# Altium PCB PCB_PowerBoard_7500-0430.PcbDoc (part 3 of 5)
Units mil, origin at the board's own origin, x right, y up, seen from the top; angles counter-clockwise.
Board outline 4000 x 3250 mil, 4 copper layers (Top Layer, Layer 1, Layer 2, Bottom Layer), stack 62.449 mil thick; 205 components, 100 nets, 1585 pads, 235 vias.
Unrouted connection lines stored in the file: 2.
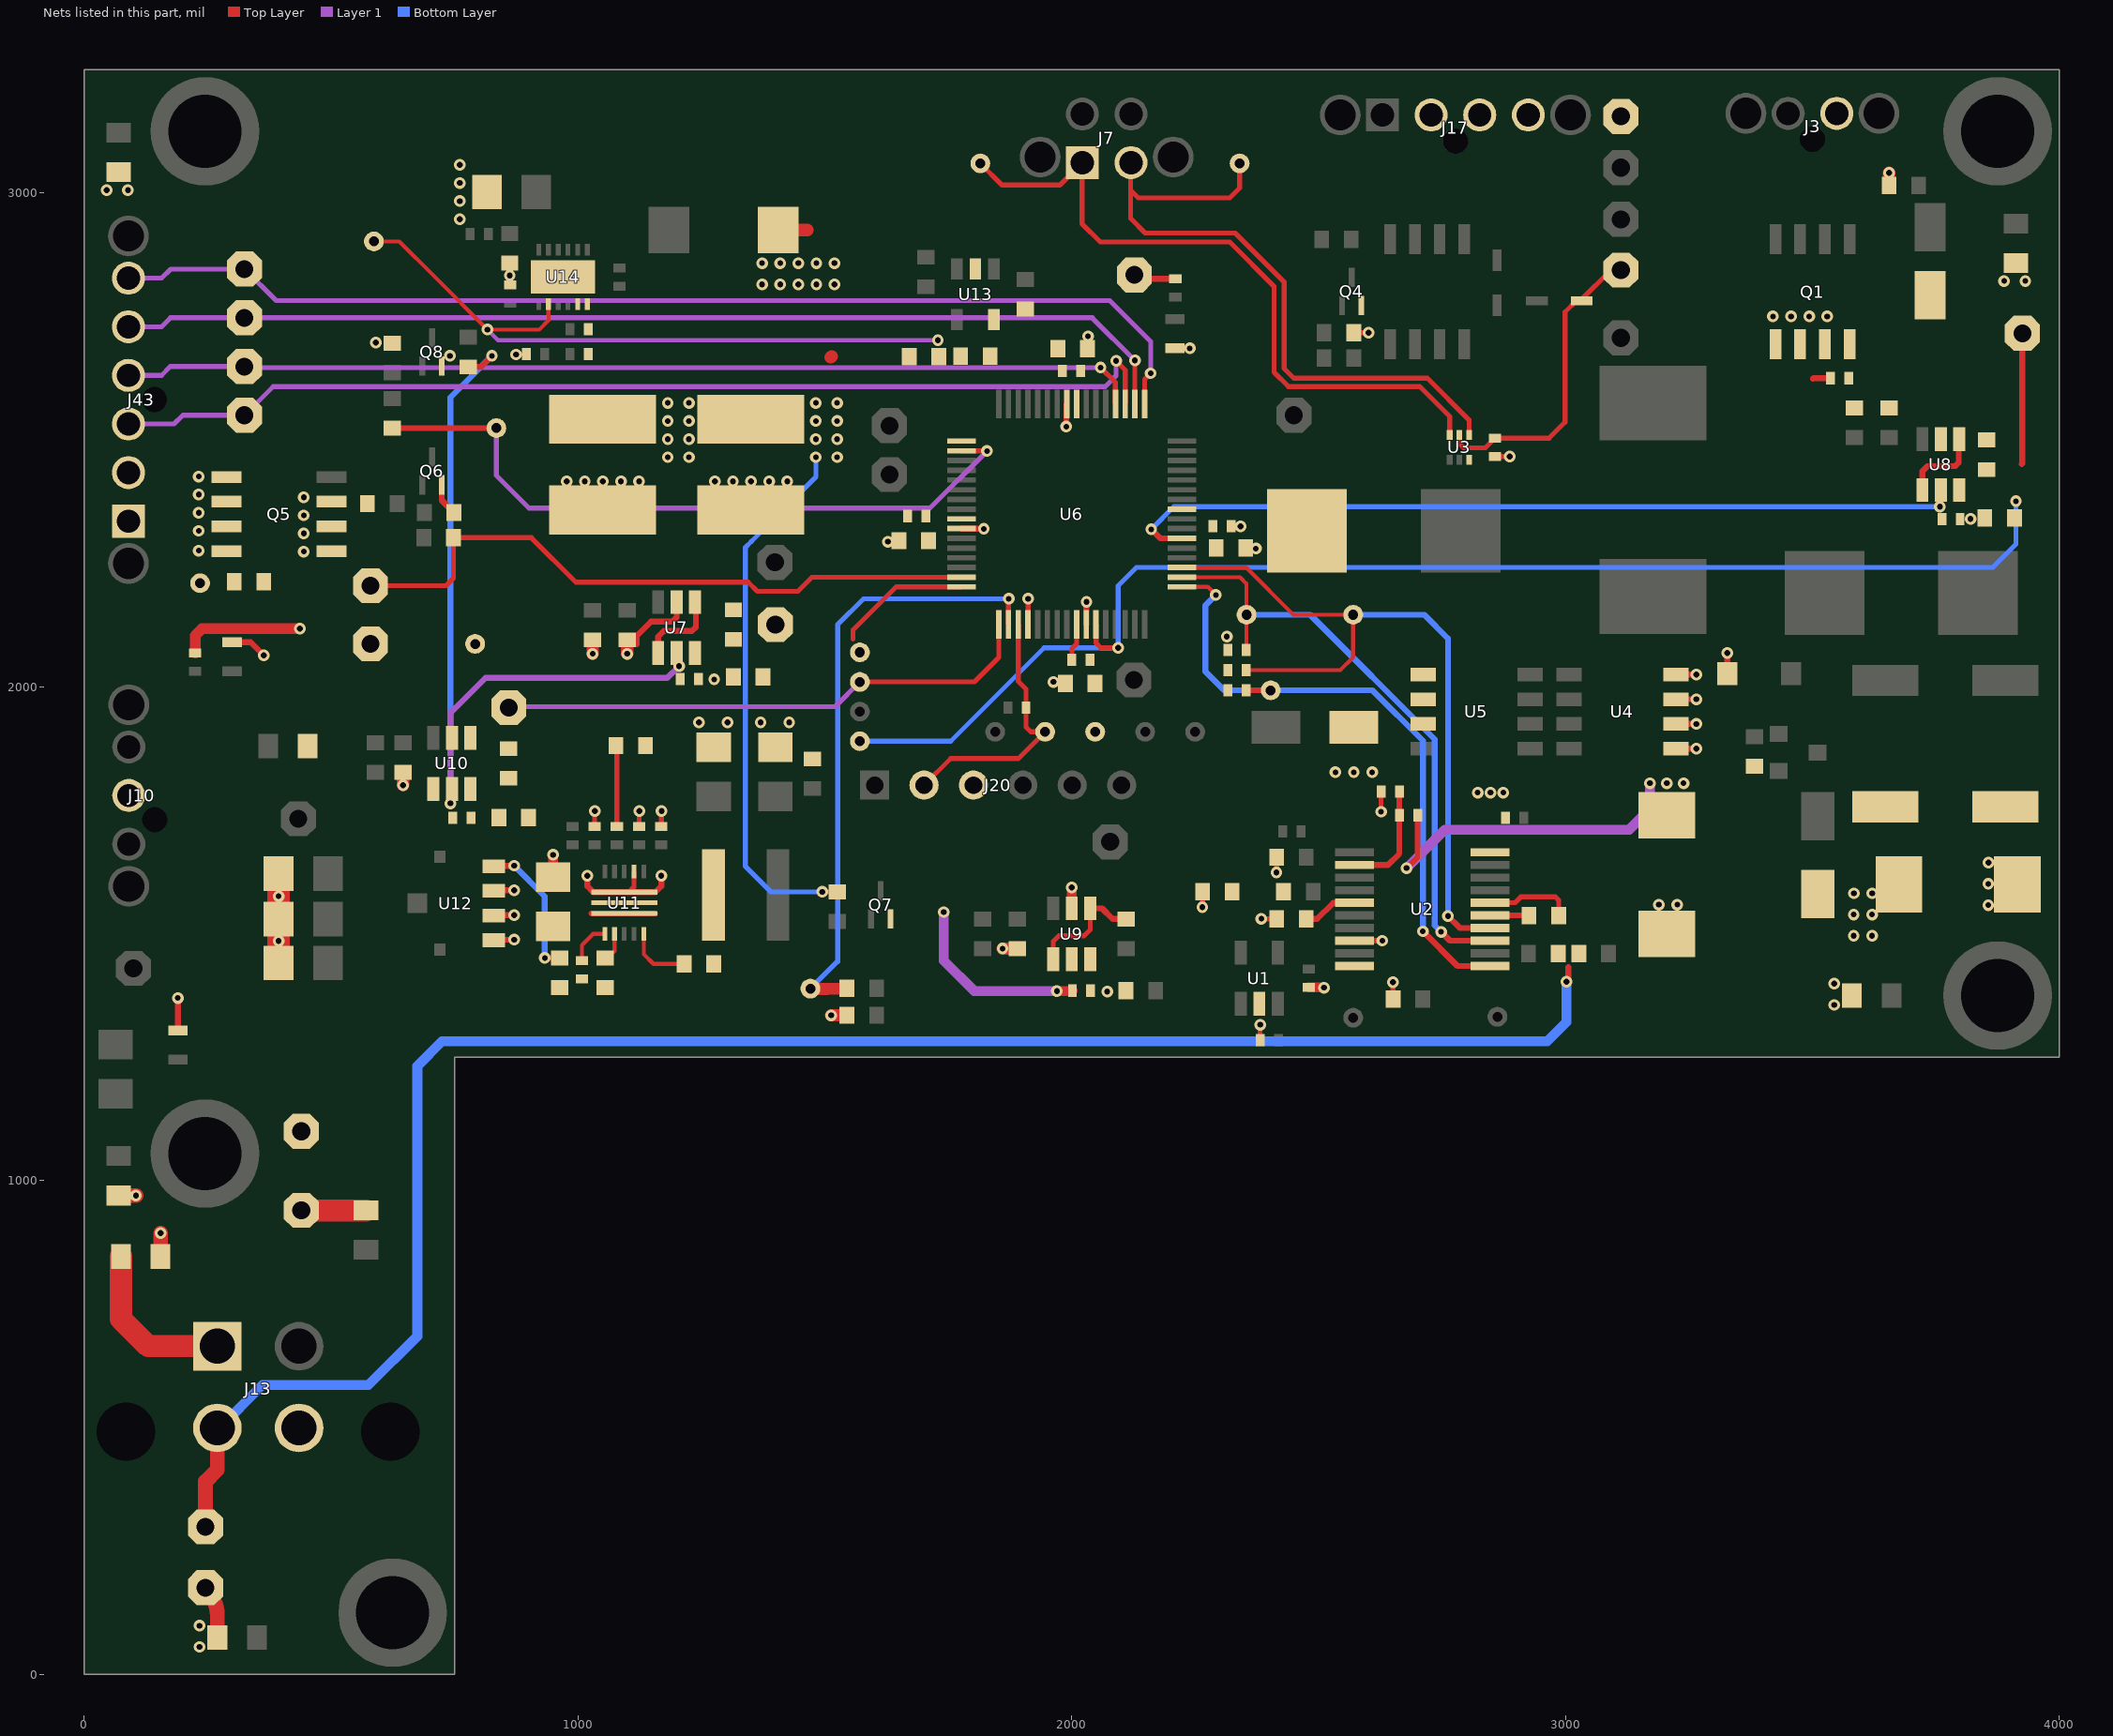
[diagram p4: the nets of this part, all layers, seen from the top]

## Part data (continued)
R10 R11 R17 R18 R19 R20 R21: library part RC0805FR-070RL, "RES 0 OHM JUMPER 1/8W 0805", Case Code (Imperial)=0805, Case Code (Metric)=2012, LCSC Part Number=C100045, Manufacturer=Yageo, Max Operating Temperature=155°C, Max Power Dissipation=125mW, Min Operating Temperature=-55°C, Resistance=0mR, Resistor Type="Thick Film", Tolerance=1%, Case/Package=0805, Category="Chip SMD Resistors", ComponentLink1Description=https://datasheet.ciiva.com/15189/getdatasheetpartid-348154-15189885.pdf?src-supplier=Verical, ComponentLink1URL=https://datasheet.ciiva.com/15189/getdatasheetpartid-348154-15189885.pdf?src-supplier=Verical, ComponentLink2Description=https://datasheet.ciiva.com/17042/rc0805-17042698.pdf?src-supplier=Future+Electronics, ComponentLink2URL=https://datasheet.ciiva.com/17042/rc0805-17042698.pdf?src-supplier=Future+Electronics, Construction=Rectangular, Contact Plating=Tin,Matte, Depth=1.25mm, Features="Moisture Resistant", Item Type=Resistor, Lead Free="Lead Free", Length=2mm, Manufacturer Part Number=RC0805FR-070RL, Military Standard=Not, Number of Terminations=2, Packaging="Tape and Reel", Power Rating=125mW, Pricing 1="5000=0.00281, 10000=0.00277, 20000=0.00269 (USD)", Radiation Hardening=No, RoHS=Yes, RoHS Compliant=Yes, Series=RC, Size Code=0805, Stock 1=85000, Supplier 1=Avnet, Supplier Part Number 1=RC0805FR-070RL
R14: library part RT0603BRD0710KL, "RES SMD 10K OHM 0.1% 1/10W 0603", Case/Package=0603, LCSC Part Number=C95204, Manufacturer=Yageo, Max Operating Temperature=155°C, Min Operating Temperature=-55°C, Package Height=0.45mm, Package Length=1.6mm, Package Style=SMTMeter, Package Width=0.8mm, Power=100mW, Rated Temperature=70°C, Resistor Type="FIXED RESISTOR", Supplier Part Number 1=1991391P, Temperature Coefficient=25ppm/°C, Tolerance=0.1%, Working Voltage=75V, Category="Chip SMD Resistors", ComponentLink1Description=https://datasheet.ciiva.com:443/pdfs/VipMasterIC/IC/YAGO/YAGO-S-A0008510989/YAGO-S-A0008510989-1.pdf?src-supplier=IHS+Markit, ComponentLink1URL=https://datasheet.ciiva.com:443/pdfs/VipMasterIC/IC/YAGO/YAGO-S-A0008510989/YAGO-S-A0008510989-1.pdf?src-supplier=IHS+Markit, ComponentLink2Description=https://datasheet.ciiva.com/5624/pyu-rt-1-to-0-05-rohs-l-4-5624351.pdf?src-supplier=Mouser, ComponentLink2URL=https://datasheet.ciiva.com/5624/pyu-rt-1-to-0-05-rohs-l-4-5624351.pdf?src-supplier=Mouser, ComponentLink3Description=https://datasheet.ciiva.com/29721/pyu-rt-1-to-0-05-rohs-l-4-29721177.pdf?src-supplier=Digi-Key, ComponentLink3URL=https://datasheet.ciiva.com/29721/pyu-rt-1-to-0-05-rohs-l-4-29721177.pdf?src-supplier=Digi-Key, Construction=Chip, Item Type=Resistor, Manufacturer Part Number=RT0603BRD0710KL, Mounting Technology="Surface Mount", Packaging="Tape and Reel", Pins=2, Pricing 1="100=0.29800, 250=0.27800, 500=0.25900, 1000=0.23700 (GBP)", Reach SVHC Compliant=Yes, RoHS=Yes, RoHS Compliant=Yes, Stock 1=20510, Supplier 1=Rs, Technology="THIN FILM", Termination=Wraparound
R15 R39 R45 R58: library part RC0603FR-071KL, "RES SMD 1K OHM 1% 1/10W 0603", Case Code (Imperial)=0603, Case Code (Metric)=1608, LCSC Part Number=C22548, Manufacturer=Yageo, Max Operating Temperature=155°C, Min Operating Temperature=-55°C, Power Rating=100mW, Resistance=1kR, Supplier Part Number 1=311-1.00KHRDKR-ND, Temperature Coefficient=100ppm/°C, Tolerance=1%, Voltage Rating=50V, Case/Package=0603, ComponentLink1Description=https://www.verical.com/server-webapp/html/getDatasheet?partID=409289&src-supplier=Verical, ComponentLink1URL=https://www.verical.com/server-webapp/html/getDatasheet?partID=409289&src-supplier=Verical, ComponentLink2Description=http://documents.rs-components.com/techlib://itc_doclist_GB.htm?stockno=5048928&src-supplier=RSComponents, ComponentLink2URL=http://documents.rs-components.com/techlib://itc_doclist_GB.htm?stockno=5048928&src-supplier=RSComponents, ComponentLink3Description=http://www.yageo.com/documents/recent/PYu-RC0603_51_RoHS_L_4.pdf?src-supplier=Avnet+Europe, ComponentLink3URL=http://www.yageo.com/documents/recent/PYu-RC0603_51_RoHS_L_4.pdf?src-supplier=Avnet+Europe, ComponentLink4Description=http://www.farnell.com/datasheets/2167052.pdf?src-supplier=Element14, ComponentLink4URL=http://www.farnell.com/datasheets/2167052.pdf?src-supplier=Element14, ComponentLink5Description=http://www.farnell.com/datasheets/1868787.pdf?src-supplier=Element14, ComponentLink5URL=http://www.farnell.com/datasheets/1868787.pdf?src-supplier=Element14, ComponentLink6Description=http://www.yageo.com/documents/recent/PYu-RC_Group_51_RoHS_L_2.pdf?src-supplier=Avnet, ComponentLink6URL=http://www.yageo.com/documents/recent/PYu-RC_Group_51_RoHS_L_2.pdf?src-supplier=Avnet, ComponentLink7Description=https://www.verical.com/server-webapp/html/getDatasheet?partID=404327&src-supplier=Verical, ComponentLink7URL=https://www.verical.com/server-webapp/html/getDatasheet?partID=404327&src-supplier=Verical, ComponentLink8Description=http://www.farnell.com/datasheets/443971.pdf?src-supplier=Element14, ComponentLink8URL=http://www.farnell.com/datasheets/443971.pdf?src-supplier=Element14, Composition="Thick Film", Contact Plating=Tin,Matte, Depth=0.8mm, Height=0.45mm, Item Type=Resistor, Lead Free="Lead Free", Length=1.6mm, Manufacturer Part Number=RC0603FR-071KL, Military Standard=Not, Packaging="Tape and Reel", Pricing 1="1=0.1, 10=0.023, 100=0.0094, 1000=0.0042, 2500=0.0037 (USD)", Radiation Hardening=No, REACH SVHC="No SVHC", Stock 1=21472395, Supplier 1=Digi-Key, Termination=SMD/SMT
R26 R31 R36 R37: library part RNCS0603BKE10K0, "Res Thin Film 0603 10K Ohm 0.1% 0.063W(1/16W) ±25ppm/C Pad SMD Automotive T/R", Case Code (Imperial)=0603, Case Code (Metric)=1608, Manufacturer="Stackpole Electronics", Max Operating Temperature=155°C, Max Power Dissipation=63mW, Min Operating Temperature=-55°C, Supplier Part Number=RNCS0603BKE10K0CT-ND, Temperature Coefficient=25ppm/°C, Tolerance=0.1%, Case/Package=0603, Category="Chip SMD Resistors", ComponentLink1Description=https://datasheet.ciiva.com/2479/sei-rncs-rnch-2479443.pdf?src-supplier=Digikey, ComponentLink1URL=https://datasheet.ciiva.com/2479/sei-rncs-rnch-2479443.pdf?src-supplier=Digikey, ComponentLink2Description=https://datasheet.ciiva.com/2479/sei-rncs-rnch-2479444.pdf?src-supplier=Digikey, ComponentLink2URL=https://datasheet.ciiva.com/2479/sei-rncs-rnch-2479444.pdf?src-supplier=Digikey, Contact Plating=Tin,Matte, Features="Moisture Resistant,Automotive AEC-Q200", Height=0.022inch, Lead Free="Lead Free", Length=0.061inch, Manufacturer Part Number=RNCS0603BKE10K0, Mounting Technology="Surface Mount", Number of Terminations=2, Packaging="Tape and Reel", Pricing="1=0.26, 10=0.191, 50=0.149, 100=0.133, 500=0.10048 (USD)", Radiation Hardening=No, RoHS=Yes, RoHS Compliant=Yes, Series=RNCS, Stock=21197, Supplier=Digikey, Width=0.031inch
R27 R33: library part CPF0603B30KE1, "Res Thin Film 0603 30K Ohm 0.1% 0.063W(1/16W) ±25ppm/C Epoxy Pad SMD Medical T/R", Manufacturer="TE Connectivity", Operating Supply Voltage=50V, Supplier Part Number=A103082CT-ND, Category="Chip SMD Resistors", ComponentLink1Description=https://datasheet.ciiva.com/22670/1723857-22670797.pdf?src-supplier=Element14, ComponentLink1URL=https://datasheet.ciiva.com/22670/1723857-22670797.pdf?src-supplier=Element14, ComponentLink2Description=https://datasheet.ciiva.com/28584/1723857-28584543.pdf?src-supplier=Element14, ComponentLink2URL=https://datasheet.ciiva.com/28584/1723857-28584543.pdf?src-supplier=Element14, ELV=5681ELVCompliant, Manufacturer Part Number=CPF0603B30KE1, Pricing="1=0.42, 10=0.299, 50=0.2326, 100=0.2077, 500=0.15724 (USD)", RoHS=Yes, Stock=3038, Supplier=Digikey, Voltage Rating (DC)=50V
R28 R29 R34 R35: library part RC0603FR-07100RL, "RES SMD 100 OHM 1% 1/10W 0603", Case Code (Imperial)=0603, Case Code (Metric)=1608, LCSC Part Number=C105588, Manufacturer=Yageo, Max Operating Temperature=155°C, Max Power Dissipation=100mW, Min Operating Temperature=-55°C, Resistance Tolerance=1%, Resistor Type="Thick Film", Temperature Coefficient=100ppm/°C, Voltage Rating=50V, Case/Package=0603, Category="Chip SMD Resistors", Construction=Rectangular, Depth=0.8mm, Features="Moisture Resistant", Height=0.45mm, Item Type=Resistor, Lead Free="Lead Free", Length=1.6mm, Manufacturer Part Number=RC0603FR-07100RL, Military Standard=Not, Number of Pins=2, Number of Terminations=2, Packaging="Tape and Reel", Power Rating=100mW, Pricing 1="5000=0.00300, 5000=0.00200, 5000=0.00450, 50000=0.00410, 500000=0.00230, 2500000=0.00140 (USD)", REACH SVHC=Unknown, Resistance=100R, RoHS=Yes, RoHS Compliant=Yes, Series=RC, Size Code=0603, Stock 1=3800000, Supplier 1="Arrow Electronics", Supplier Part Number 1=RC0603FR-07100RL, Technology="THICK FILM", Termination=SMD/SMT, Tolerance=1%, Voltage Rating (DC)=50V, Width=0.8mm
R30: library part CPF0603B15KE1, "Res Thin Film 0603 15K Ohm 0.1% 0.063W(1/16W) ±25ppm/C Pad SMD T/R", Case Code (Imperial)=0603, Case Code (Metric)=1608, Manufacturer="TE Connectivity Neohm", Max Operating Temperature=155°C, Max Power Dissipation=63mW, Min Operating Temperature=-55°C, Number of Resistors=1, Operating Supply Voltage=50V, Package Quantity=1000, Resistance Tolerance=0.1%, Resistor Type="Thin Film", Supplier Part Number=A103258CT-ND, Temperature Coefficient=25ppm/°C, Voltage Rating (DC)=120V, Case/Package=0603, Category="Chip SMD Resistors", ComponentLink1Description=https://datasheet.ciiva.com/12795/eng-ds-1773200-i-12795533.pdf?src-supplier=Mouser, ComponentLink1URL=https://datasheet.ciiva.com/12795/eng-ds-1773200-i-12795533.pdf?src-supplier=Mouser, Depth=800um, ELV=5681ELVCompliant, Height=0.45mm, Lead Free=5697LeadFree, Length=1.55mm, Manufacturer Part Number=CPF0603B15KE1, Military Standard=4991MilitaryStandard, Mounting Technology="Surface Mount", Number of Terminations=2, Packaging="Tape and Reel", Pins=2, Power Rating=63mW, Pricing="1=0.39, 10=0.285, 50=0.2196, 100=0.1951, 500=0.14598 (USD)", Radiation Hardening=5898YesNo, Reach SVHC Compliant=No, RoHS=Yes, RoHS Compliant=Yes, Series=CPF, Stock=29093, Supplier=Digikey, Termination=Solder, Tolerance=0.1%, Voltage Rating=50V, Weight=7.1E-05oz, Width=0.8mm
R32: library part CPF0603B18KE1, "Res Thin Film 0603 18K Ohm 0.1% 0.063W(1/16W) ±25ppm/C Pad SMD T/R", Manufacturer="TE Connectivity Neohm", Supplier Part Number=A103052DKR-ND, Category="Chip SMD Resistors", ComponentLink1Description=https://datasheet.ciiva.com/7789/eng-ds-1773200-j-7789479.pdf?src-supplier=Element14, ComponentLink1URL=https://datasheet.ciiva.com/7789/eng-ds-1773200-j-7789479.pdf?src-supplier=Element14, ComponentLink2Description=https://datasheet.ciiva.com/7789/eng-ds-1773200-j-7789480.pdf?src-supplier=Element14, ComponentLink2URL=https://datasheet.ciiva.com/7789/eng-ds-1773200-j-7789480.pdf?src-supplier=Element14, Manufacturer Part Number=CPF0603B18KE1, Pricing="1=0.4, 10=0.291, 50=0.2244, 100=0.1993, 500=0.14912 (USD)", RoHS=Yes, Stock=10956, Supplier=Digikey
R40: library part HCJ0805ZT0R00, "HCJ Series 0805 Jumper Surface Mount Chip Resistor", Case Code (Imperial)=0805, Case Code (Metric)=2012, Manufacturer="Stackpole Electronics", Max Operating Temperature=155°C, Min Operating Temperature=-55°C, Package Quantity=1, Power Rating=500mW, Supplier Part Number=HCJ0805ZT0R00CT-ND, Case/Package=0805, Category="Chip SMD Resistors", ComponentLink1Description=http://www.seielect.com/Catalog/SEI-HCJ.pdf?src-supplier=Avnet, ComponentLink1URL=http://www.seielect.com/Catalog/SEI-HCJ.pdf?src-supplier=Avnet, ComponentLink2Description=https://www.seielect.com/catalog/SEI-Packaging.pdf?src-supplier=Digikey, ComponentLink2URL=https://www.seielect.com/catalog/SEI-Packaging.pdf?src-supplier=Digikey, Height=0.026inch, Lead Free="Lead Free", Length=0.079inch, Manufacturer Part Number=HCJ0805ZT0R00, Mounting Technology="Surface Mount", Number of Terminations=2, Packaging="Cut Tape", Pricing="1=0.55, 10=0.397, 25=0.318, 50=0.2364, 100=0.1666, 250=0.14848, 500=0.12726, 1000=0.09696 (USD)", Radiation Hardening=No, RoHS=Yes, RoHS Compliant=Yes, Series=HCJ, Stock=154858, Supplier=Digikey, Width=0.049inch
R42: library part 1206W4F4641T5E, "250mW Thick Film Resistors 200V ±100ppm/℃ ±1% 4.64kΩ 1206 Chip Resistor - Surface Mount ROHS", JLC Part Number=C247270, Manufacturer=UNI-ROYAL, ComponentLink1Description=JLCPCB, ComponentLink1URL=https://jlcpcb.com/kr/partdetail/244478-1206W4F4641T5E/C247270, Item Type=Resistor, Manufacturer Part Number=1206W4F4641T5E
R43 R50: library part RTT021333FTH, "62.5mW Thick Film Resistors 50V ±100ppm/℃ ±1% 133kΩ 0402 Chip Resistor - Surface Mount ROHS", JLCPCB Part Number=C102801, Manufacturer=RALEC, ComponentLink1Description=JLCPCB, ComponentLink1URL=https://jlcpcb.com/kr/partdetail/Ralec-RTT021333FTH/C102801, Item Type=Resistor, Manufacturer Part Number=RTT021333FTH
R44: library part RC-02W7323FT, "62.5mW Thick Film Resistors ±1% ±200ppm/℃ 732kΩ 0402 Chip Resistor - Surface Mount ROHS", JLCPCB Part Number=C321608, Manufacturer="FH (Guangdong Fenghua Advanced Tech)", Package=Res-0402, Item Type=Resistor, Manufacturer Part Number=RC-02W7323FT
R47: library part CRCW040280K6FKED, "62.5mW Thick Film Resistors 75V ±1% ±100ppm/℃ 80.6kΩ 0402 Chip Resistor - Surface Mount ROHS", JLCPCB Part Number=C2076816, Manufacturer="Vishay Intertech", Package=Res-0402, Item Type=Resistor, Manufacturer Part Number=CRCW040280K6FKED
R48: library part CR0402FF1743G, "62.5mW Thick Film Resistors 50V ±1% ±200ppm/℃ 174kΩ 0402 Chip Resistor - Surface Mount ROHS", LCSC Part Number=C100271, Manufacturer="LIZ Elec", Package=0402, ComponentLink1Description=JLCPCB, ComponentLink1URL=https://jlcpcb.com/kr/partdetail/LizElec-CR0402FF1743G/C100271, Item Type=Resistor, Manufacturer Part Number=CR0402FF1743G
R49: library part RM04FTN8662, "62.5mW Thick Film Resistors 50V ±100ppm/℃ ±1% 86.6kΩ 0402 Chip Resistor - Surface Mount ROHS", Manufacturer="TA-I Tech", Package=0402, ComponentLink1Description=JLCPCB, ComponentLink1URL=https://jlcpcb.com/kr/partdetail/ta_iTech-RM04FTN8662/C188001, Manufacturer Part no=RM04FTN8662
R52 R54: library part RTT031151FTP, "100mW Thick Film Resistors 75V ±100ppm/℃ ±1% 1.15kΩ 0603 Chip Resistor - Surface Mount ROHS", JLC Part Number=C103239, Manufacturer=RALAC, ComponentLink1Description=JLC, ComponentLink1URL=https://jlcpcb.com/kr/partdetail/Ralec-RTT031151FTP/C103239, Item Type=Resistor, Manufacture Part Number=RTT031151FTP
R53: library part RC0402BR-07499KL, "RES 499K OHM 0.1% 1/16W 0402", LCSC Part Number=C851813, Manufacturer=Yageo, Category="Chip SMD Resistors", Item Type=Resistor, Manufacturer Part Number=RC0402BR-07499KL, Pricing="1=0.2812, 10=0.1024, 25=0.1013, 100=0.065, 250=0.0644, 500=0.0615, 1000=0.0541, 3000=0.0457 (USD)", RoHS=Yes, RoHS Compliant=Yes, Stock=5065, Supplier="Arrow Electronics", Supplier Part Number=RC0402BR-07499KL
R55: library part RC0402FR-0795K3L, "RES 95.3K OHM 1% 1/16W 0402", Case Code (Imperial)=0402, Case Code (Metric)=1005, LCSC Part Number=C276280, Manufacturer=Yageo, Max Operating Temperature=155°C, Max Power Dissipation=63mW, Min Operating Temperature=-55°C, Package Quantity=1, Power Rating=62.5mW, Resistance=95.3kR, Resistance Tolerance=1%, Resistor Type="Thick Film", Supplier Part Number 1=8486029, Temperature Coefficient=100ppm/°C, Voltage Rating=50V, Case/Package=0402, Category="Chip SMD Resistors", ComponentLink1Description=https://datasheet.ciiva.com/2453/pyu-r-int-thick-7-2453485.pdf?src-supplier=Digi-Key, ComponentLink1URL=https://datasheet.ciiva.com/2453/pyu-r-int-thick-7-2453485.pdf?src-supplier=Digi-Key, ComponentLink2Description=https://datasheet.ciiva.com/2453/pyu-r-int-thick-7-2453486.pdf?src-supplier=Digi-Key, ComponentLink2URL=https://datasheet.ciiva.com/2453/pyu-r-int-thick-7-2453486.pdf?src-supplier=Digi-Key, ComponentLink3Description=https://datasheet.ciiva.com/2453/pyu-r-int-thick-7-2453484.pdf?src-supplier=Digi-Key, ComponentLink3URL=https://datasheet.ciiva.com/2453/pyu-r-int-thick-7-2453484.pdf?src-supplier=Digi-Key, ComponentLink4Description=https://datasheet.ciiva.com/16746/pyu-rc0402-51-rohs-l-6-r-16746015.pdf?src-supplier=Future+Electronics, ComponentLink4URL=https://datasheet.ciiva.com/16746/pyu-rc0402-51-rohs-l-6-r-16746015.pdf?src-supplier=Future+Electronics, Construction=Rectangular, Contact Plating=Tin,Matte, Depth=0.5mm, Features="Moisture Resistant", Height=0.016inch, Item Type=Resistor, Lead Free="Lead Free", Length=0.039inch, Manufacturer Part Number=RC0402FR-0795K3L, Military Standard=Not, Number of Terminations=2, Packaging="Tape and Reel", Pricing 1="10000=0.00090, 50000=0.00080, 300000=0.00080, 1000000=0.00070, 3000000=0.00070 (USD)", RoHS=Yes, RoHS Compliant=Yes, Series=RC, Size Code=0402, Stock 1=20000, Supplier 1="Future Electronics", Termination=SMD/SMT, Tolerance=1%, Voltage Rating (DC)=50V, Width=0.02inch
R57: library part RC0402FR-0795K3L
U1: "IC VREF SERIES 0.2% TSOT5", LCSC Part Number=C659518, Manufacturer="Analog Devices", ComponentLink1Description=https://datasheet.ciiva.com/22697/751436-22697083.pdf?src-supplier=Element14, ComponentLink1URL=https://datasheet.ciiva.com/22697/751436-22697083.pdf?src-supplier=Element14, ComponentLink2Description=https://datasheet.ciiva.com/3237/adr360-361-363-364-365-366-3237020.pdf?src-supplier=Avnet, ComponentLink2URL=https://datasheet.ciiva.com/3237/adr360-361-363-364-365-366-3237020.pdf?src-supplier=Avnet, ComponentLink3Description=https://datasheet.ciiva.com/1172/751436-1172568.pdf?src-supplier=Element14, ComponentLink3URL=https://datasheet.ciiva.com/1172/751436-1172568.pdf?src-supplier=Element14, Item Type=IC, Manufacturer Part Number=ADR364AUJZ-REEL7, Pricing="1=2.73, 10=2.452, 25=2.318, 100=2.0089, 250=1.90588, 500=1.71014, 1000=1.44228 (USD)", RoHS=Yes, Stock=4393, Supplier=Digikey
U2: "Battery Charger Lead-Acid/Li-Ion/NiCD/NiMH 4000mA 18V 20-Pin SSOP", Case/Package=SSOP, LCSC Part Number=C7456664, Manufacturer=Maxim, Max Operating Temperature=85°C, Min Operating Temperature=-40°C, Operating Supply Voltage=28V, Output Current=4A, Supplier Part Number 1=700-MAX1647EAP+, ComponentLink1Description=http://datasheets.maxim-ic.com/en/ds/MAX1647-MAX1648.pdf?src-supplier=Avnet, ComponentLink1URL=http://datasheets.maxim-ic.com/en/ds/MAX1647-MAX1648.pdf?src-supplier=Avnet, Item Type=IC, Manufacturer Part Number=MAX1647EAP+, Mount="Surface Mount", Packaging=Rail/Tube, Pricing 1="1=14.28, 10=13.13, 50=12.59, 100=11.09, 1000=9.86, 10000=9.86 (USD)", Radiation Hardening=No, RoHS=Yes, RoHS Compliant=Yes, Stock 1=19, Supplier 1=Mouser
U3: "20-V, 1-A H-BRIDGE MOTOR DRIVER", LCSC Part Number=C3681351, Manufacturer="Texas Instruments", Height=600um, Item Type=IC, Length=1.6mm, Manufacturer Part Number=DRV8220DRLR, Number of Channels=1NUMBER, Pins=6NUMBER, Pricing="1=0.76, 10=0.627, 50=0.627, 100=0.475, 1000=0.324, 10000=0.262 (USD)", RoHS=No, Stock=3584, Supplier=Mouser, Thickness=550um, Width=1.2mm
U4 U5: "MOSFET N-CH 30V 11A 8SO", Manufacturer=Diodes, Supplier Part Number=DMS3015SSS-13DICT-ND, ComponentLink1Description=https://datasheet.ciiva.com/8115/ds32096-8115505.pdf?src-supplier=Avnet, ComponentLink1URL=https://datasheet.ciiva.com/8115/ds32096-8115505.pdf?src-supplier=Avnet, ComponentLink2Description=https://datasheet.ciiva.com/4443/ds32096-88633-4443151.pdf?src-supplier=Mouser, ComponentLink2URL=https://datasheet.ciiva.com/4443/ds32096-88633-4443151.pdf?src-supplier=Mouser, ComponentLink3Description=https://datasheet.ciiva.com/6367/ds32096-6367776.pdf?src-supplier=Digikey, ComponentLink3URL=https://datasheet.ciiva.com/6367/ds32096-6367776.pdf?src-supplier=Digikey, ComponentLink4Description=https://datasheet.ciiva.com/6367/ds32096-6367773.pdf?src-supplier=Digikey, ComponentLink4URL=https://datasheet.ciiva.com/6367/ds32096-6367773.pdf?src-supplier=Digikey, ComponentLink5Description=https://datasheet.ciiva.com/6367/ds32096-6367774.pdf?src-supplier=Digikey, ComponentLink5URL=https://datasheet.ciiva.com/6367/ds32096-6367774.pdf?src-supplier=Digikey, Item Type=IC, Manufacturer Part Number=DMS3015SSS-13, Pricing="1=0.43, 10=0.366, 100=0.2543, 500=0.19854, 1000=0.16138 (USD)", RoHS=Yes, Stock=41483, Supplier=Digikey
U6: "IC MCU 8BIT 96KB FLASH 64TQFP", Case/Package=TQFP, Clock Frequency=40MHz, Manufacturer=Microchip, Max Operating Temperature=125°C, Max Power Dissipation=1W, Max Supply Voltage=5.5V, Min Operating Temperature=-40°C, Min Supply Voltage=4.2V, Operating Supply Voltage=5V, Package Quantity=1200, Supplier Part Number=PIC18F6627T-E/PT-ND, Access Time=40us, ComponentLink1Description=https://datasheet.ciiva.com/1496/39646c-1496640.pdf?src-supplier=Avnet, ComponentLink1URL=https://datasheet.ciiva.com/1496/39646c-1496640.pdf?src-supplier=Avnet, ComponentLink2Description=https://datasheet.ciiva.com/6650/39646c-6650215.pdf?src-supplier=Digikey, ComponentLink2URL=https://datasheet.ciiva.com/6650/39646c-6650215.pdf?src-supplier=Digikey, Core Architecture=PIC, Data Bus Width=8b, Frequency=40MHz, Interface=I2C,SPI,UART,USART, Item Type=Microcontrollers, Lead Free="Lead Free", Manufacturer Part Number=PIC18F6627T-E/PT, Memory Format=FLASH, Memory Size=96KB, Mounting Technology="Surface Mount", Number of Programmable I/O=54, Number of Timers/Counters=5, Oscillator Type=Internal, Packaging="Tape and Reel", Peripherals="Brown-out Detect/Reset,POR,PWM,WDT,HLVD", Pins=64, Pricing="1200=9.8625 (USD)", Radiation Hardening=No, RAM Size=3936B, RoHS=Yes, RoHS Compliant=Yes, Series="PIC® 18F", Supplier=Digikey, Watchdog Timer=Yes
U7 U8 U9 U10: "IC OPAMP GP 1 CIRCUIT SOT23-6", LCSC Part Number=C2058417, Manufacturer="Texas Instruments", Supplier Part Number 1=296-48631-1-ND, ComponentLink1Description=https://datasheet.ciiva.com/1813/opa2364-1813015.pdf?src-supplier=Digikey, ComponentLink1URL=https://datasheet.ciiva.com/1813/opa2364-1813015.pdf?src-supplier=Digikey, Item Type=IC, Manufacturer Part Number=OPA363AIDBVR, Pricing 1="1=1.86, 10=1.67, 25=1.5756, 100=1.3424, 250=1.26048, 500=1.10292, 1000=0.91385 (USD)", RoHS=Yes, Stock 1=2246, Supplier 1=Digikey
U11: "20-V, 10-A fully integrated sync boost with load disconnect 13-VQFN-HR -40 to 85", Manufacturer="Texas Instruments", Supplier Part Number=296-46568-1-ND, Category="Voltage Regulators - Switching", ComponentLink1Description=http://www.ti.com/lit/ds/symlink/tps61178.pdf?src-supplier=Digikey, ComponentLink1URL=http://www.ti.com/lit/ds/symlink/tps61178.pdf?src-supplier=Digikey, Manufacturer Part Number=TPS611781RNWT, Pricing="1=5.66, 10=5.084, 25=4.8064, 100=4.1655 (USD)", RoHS=Yes, Stock=351, Supplier=Digikey
U12: "MOSFET P-CH 30V 60A PPAK SO-8", LCSC Part Number=C144873, Manufacturer="Vishay Siliconix", ComponentLink1Description=https://datasheet.ciiva.com/4441/si7145dp-223652-4441979.pdf?src-supplier=Mouser, ComponentLink1URL=https://datasheet.ciiva.com/4441/si7145dp-223652-4441979.pdf?src-supplier=Mouser, ComponentLink2Description=https://datasheet.ciiva.com/6367/si7145dp-6367329.pdf?src-supplier=Digikey, ComponentLink2URL=https://datasheet.ciiva.com/6367/si7145dp-6367329.pdf?src-supplier=Digikey, ComponentLink3Description=https://datasheet.ciiva.com/28599/1913296-28599670.pdf?src-supplier=Element14, ComponentLink3URL=https://datasheet.ciiva.com/28599/1913296-28599670.pdf?src-supplier=Element14, ComponentLink4Description=https://datasheet.ciiva.com/22671/1913296-22671737.pdf?src-supplier=Element14, ComponentLink4URL=https://datasheet.ciiva.com/22671/1913296-22671737.pdf?src-supplier=Element14, Item Type=MOSFET, Manufacturer Part Number=SI7145DP-T1-GE3, Pricing="1=1.84, 10=1.58, 50=1.58, 100=1.32, 1000=1.04, 10000=0.956 (USD)", RoHS=Yes, Stock=108048, Supplier=Mouser
U13: "LD2981 Series 100 mA 5 V Fixed Output LDO Regulator with Inhibit - SOT-23-5", JLC Part Number=C157380, Manufacturer=STMicroelectronics, Supplier Part Number=497-7787-1-ND, Category="Voltage Regulators - Linear", ComponentLink1Description=JLCPCB, ComponentLink1URL=https://jlcpcb.com/kr/partdetail/Stmicroelectronics-LD2981CM50TR/C157380, ComponentLink2Description=https://datasheet.ciiva.com/2043/cd00001635-2043543.pdf?src-supplier=Digikey, ComponentLink2URL=https://datasheet.ciiva.com/2043/cd00001635-2043543.pdf?src-supplier=Digikey, ComponentLink3Description=https://datasheet.ciiva.com/2043/cd00001635-2043544.pdf?src-supplier=Digikey, ComponentLink3URL=https://datasheet.ciiva.com/2043/cd00001635-2043544.pdf?src-supplier=Digikey, ComponentLink4Description=https://datasheet.ciiva.com/2043/cd00001635-2043545.pdf?src-supplier=Digikey, ComponentLink4URL=https://datasheet.ciiva.com/2043/cd00001635-2043545.pdf?src-supplier=Digikey, ComponentLink5Description=https://datasheet.ciiva.com/16443/cd00001635-16443657.pdf?src-supplier=Future+Electronics, ComponentLink5URL=https://datasheet.ciiva.com/16443/cd00001635-16443657.pdf?src-supplier=Future+Electronics, Item Type=IC, Manufacturer Part Number=LD2981CM50TR, Pricing="1=0.93, 10=0.83, 25=0.788, 100=0.6474, 250=0.60512, 500=0.53476, 1000=0.42219 (USD)", RoHS=Yes, Stock=17151, Supplier=Digikey
U14: "IC REG BUCK ADJ 5A 12DFN", LCSC Part Number=-, Manufacturer="Renesas Electronics Corporation", Package="12-DFN (4x3)", ComponentLink1Description=LCSC, Item Type=IC, Manufacturer Part Number=ISL85005AFRZ-T7A

## Free pads (board coordinates)
  round 2.5 on Mech6: 1(0,0) 1(0,0) 1(0,3250) 1(0,3250) 1(750,0) 1(750,0) 1(750,1250) 1(750,1250) 1(4000,1250) 1(4000,1250) 1(4000,3250) 1(4000,3250)
  round 5 on Mech6: 1(0,3262.5) 1(4000,3262.5) 1(4012.5,1250) 1(4012.5,1250) 1(4012.5,3250)
  round 4 on Mech4: 1(21,1560) 1(21,1560) 1(21,2000) 1(21,2000) 1(21,2214) 1(21,2214) 1(21,2948) 1(21,2948) 1(50,1560) 1(50,2000) 1(50,2214) 1(50,2948) 1(130,1560) 1(130,2000) 1(130,2214) 1(130,2948) 1(159,1560) 1(159,1560) 1(159,1678) 1(159,1678) 1(159,1678) 1(159,1690) 1(159,1770) 1(159,1882) 1(159,1882) 1(159,1882) 1(159,2000) 1(159,2000) 1(159,2214) 1(159,2214) 1(159,2479) 1(159,2479) 1(159,2479) 1(159,2540) 1(159,2620) 1(159,2683) 1(159,2683) 1(159,2683) 1(159,2948) 1(159,2948) 1(271,1678) 1(271,1678) 1(271,1882) 1(271,1882) 1(272,2479) 1(272,2479) 1(272,2683) 1(272,2683) 1(950,2330) 1(950,2570) 1(1150,2330) 1(1150,2570) 1(1250,2330) 1(1250,2570) 1(1450,2330) 1(1450,2570) 1(2749,2440) 1(2749,2440) 1(2749,2448) 1(2749,2448) 1(3400,2977) 1(3400,2977) 1(3400,3089) 1(3600,2977) 1(3600,2977) 1(3600,3089)
  round 2.5 on Mech4: 1(23.91,346.1) 1(23.91,346.1) 1(23.91,420.23) 1(23.91,564.02) 1(23.91,779.17) 1(23.91,779.17) 1(206.1,2018.5) 1(206.1,2081.5) 1(243.9,2018.5) 1(243.9,2081.5) 1(316.26,2251.57) 1(316.26,2251.57) 1(316.26,2448.43) 1(316.26,2448.43) 1(473.74,2251.57) 1(473.74,2251.57) 1(473.74,2448.43) 1(473.74,2448.43) 1(551.1,1808.5) 1(551.1,1871.5) 1(578.35,2363.98) 1(578.35,2386.02) 1(588.9,1808.5) 1(588.9,1871.5) 1(612.98,2532.35) 1(612.98,2575.65) 1(612.98,2629.35) 1(612.98,2672.65) 1(616.1,1808.5) 1(616.1,1871.5) 1(621.65,2363.98) 1(621.65,2386.02) 1(635.02,2532.35) 1(635.02,2575.65) 1(635.02,2629.35) 1(635.02,2672.65) 1(653.9,1808.5) 1(653.9,1871.5) 1(677.45,346.1) 1(677.45,346.1) 1(677.45,420.23) 1(677.45,564.02) 1(677.45,779.17) 1(677.45,779.17) 1(683.35,2238.98) 1(683.35,2261.02) 1(683.35,2288.98) 1(683.35,2311.02) 1(726.65,2238.98) 1(726.65,2261.02) 1(726.65,2288.98) 1(726.65,2311.02) 1(738.35,2828.98) 1(738.35,2851.02) 1(781.65,2828.98) 1(781.65,2851.02) 1(818.98,2628.35) 1(818.98,2671.65) 1(841.02,2628.35) 1(841.02,2671.65) 1(841.1,1813.5) 1(841.1,1876.5) 1(878.9,1813.5) 1(878.9,1876.5) 1(891.26,2770.94) 1(891.26,2770.94) 1(891.26,2889.06) 1(891.26,2889.06) 1(988.98,1688.35) 1(988.98,1731.65) 1(1011.02,1688.35) 1(1011.02,1731.65) 1(1011.1,2093.5) 1(1011.1,2156.5) 1(1033.98,1688.35) 1(1033.98,1731.65) 1(1043.98,1393.35) 1(1043.98,1436.65) 1(1048.74,2770.94) 1(1048.74,2770.94) 1(1048.74,2889.06) 1(1048.74,2889.06) 1(1048.9,2093.5) 1(1048.9,2156.5) 1(1056.02,1688.35) 1(1056.02,1731.65) 1(1066.02,1393.35) 1(1066.02,1436.65) 1(1078.98,1688.35) 1(1078.98,1731.65) 1(1081.1,2093.5) 1(1081.1,2156.5) 1(1101.02,1688.35) 1(1101.02,1731.65) 1(1118.9,2093.5) 1(1118.9,2156.5) 1(1123.98,1688.35) 1(1123.98,1731.65) 1(1146.02,1688.35) 1(1146.02,1731.65) 1(1168.98,1688.35) 1(1168.98,1731.65) 1(1191.02,1688.35) 1(1191.02,1731.65) 1(1296.1,2093.5) 1(1296.1,2156.5) 1(1318.35,2668.98) 1(1318.35,2691.02) 1(1333.9,2093.5) 1(1333.9,2156.5) 1(1361.65,2668.98) 1(1361.65,2691.02) 1(1403.35,2668.98) 1(1403.35,2691.02) 1(1446.65,2668.98) 1(1446.65,2691.02) 1(1471.1,1838.5) 1(1471.1,1901.5) 1(1508.9,1838.5) 1(1508.9,1901.5) 1(1513.98,1533.35) 1(1513.98,1576.65) 1(1536.02,1533.35) 1(1536.02,1576.65) 1(1553.35,1328.98) 1(1553.35,1351.02) 1(1553.35,1378.98) 1(1553.35,1401.02) 1(1596.65,1328.98) 1(1596.65,1351.02) 1(1596.65,1378.98) 1(1596.65,1401.02) 1(1679.35,2657.98) 1(1679.35,2680.02) 1(1693.98,2818.35) 1(1693.98,2861.65) 1(1716.02,2818.35) 1(1716.02,2861.65) 1(1722.65,2657.98) 1(1722.65,2680.02) 1(1753.35,1913.98) 1(1753.35,1936.02) 1(1796.65,1913.98) 1(1796.65,1936.02) 1(1800,2150) 1(1800,2150) 1(1800,2196) 1(1800,2504) 1(1800,2550) 1(1800,2550) 1(1801.1,1468.5) 1(1801.1,1531.5) 1(1838.9,1468.5) 1(1838.9,1531.5) 1(1846,2150) 1(1846,2550) 1(1871.1,1468.5) 1(1871.1,1531.5) 1(1908.9,1468.5) 1(1908.9,1531.5) 1(2091.1,1468.5) 1(2091.1,1531.5) 1(2128.9,1468.5) 1(2128.9,1531.5) 1(2154,2150) 1(2154,2550) 1(2171.1,2793.5) 1(2171.1,2856.5) 1(2200,2150) 1(2200,2150) 1(2200,2196) 1(2200,2504) 1(2200,2550) 1(2200,2550) 1(2208.9,2793.5) 1(2208.9,2856.5) 1(2328.35,1958.98) 1(2328.35,1981.02) 1(2328.35,2008.98) 1(2328.35,2031.02) 1(2328.35,2058.98) 1(2328.35,2081.02) 1(2371.65,1958.98) 1(2371.65,1981.02) 1(2371.65,2008.98) 1(2371.65,2031.02) 1(2371.65,2058.98) 1(2371.65,2081.02) 1(2394.35,2950.98) 1(2394.35,2973.02) 1(2399.35,2637.98) 1(2399.35,2660.02) 1(2399.35,2688.98) 1(2399.35,2711.02) 1(2428.35,1573.98) 1(2428.35,1596.02) 1(2428.35,1703.98) 1(2428.35,1726.02) 1(2437.65,2950.98) 1(2437.65,2973.02) 1(2442.65,2637.98) 1(2442.65,2660.02) 1(2442.65,2688.98) 1(2442.65,2711.02) 1(2471.65,1573.98) 1(2471.65,1596.02) 1(2471.65,1703.98) 1(2471.65,1726.02) 1(2501.57,2721.26) 1(2501.57,2721.26) 1(2501.57,2878.74) 1(2501.57,2878.74) 1(2666.26,1851.57) 1(2666.26,1851.57) 1(2666.26,2048.43) 1(2666.26,2048.43) 1(2673.35,1728.98) 1(2673.35,1751.02) 1(2698.43,2721.26) 1(2698.43,2721.26) 1(2698.43,2878.74) 1(2698.43,2878.74) 1(2716.65,1728.98) 1(2716.65,1751.02) 1(2823.74,1851.57) 1(2823.74,1851.57) 1(2823.74,2048.43) 1(2823.74,2048.43) 1(2933.35,1448.98) 1(2933.35,1471.02) 1(2976.65,1448.98) 1(2976.65,1471.02) 1(3028.35,1448.98) 1(3028.35,1471.02) 1(3036.26,1851.57) 1(3036.26,1851.57) 1(3036.26,2048.43) 1(3036.26,2048.43) 1(3071.65,1448.98) 1(3071.65,1471.02) 1(3193.74,1851.57) 1(3193.74,1851.57) 1(3193.74,2048.43) 1(3193.74,2048.43) 1(3401.57,2721.26) 1(3401.57,2721.26) 1(3401.57,2878.74) 1(3401.57,2878.74) 1(3498.98,1718.35) 1(3498.98,1761.65) 1(3521.02,1718.35) 1(3521.02,1761.65) 1(3556.1,2543.5) 1(3556.1,2606.5) 1(3593.9,2543.5) 1(3593.9,2606.5) 1(3598.43,2721.26) 1(3598.43,2721.26) 1(3598.43,2878.74) 1(3598.43,2878.74) 1(3626.1,2543.5) 1(3626.1,2606.5) 1(3642.35,2698.98) 1(3642.35,2721.02) 1(3663.9,2543.5) 1(3663.9,2606.5) 1(3685.65,2698.98) 1(3685.65,2721.02) 1(3856.1,2508.5) 1(3856.1,2571.5) 1(3893.9,2508.5) 1(3893.9,2571.5)
  round 3 on Mech4: 1(38,1164) 1(38,1286) 1(46.38,990.31) 1(46.38,1029.69) 1(46.38,3062.31) 1(46.38,3101.69) 1(93.62,990.31) 1(93.62,1029.69) 1(93.62,3062.31) 1(93.62,3101.69) 1(95.31,826.38) 1(95.31,873.62) 1(102,1164) 1(102,1286) 1(134.69,826.38) 1(134.69,873.62) 1(174,1243) 1(174,1307) 1(206,1243) 1(206,1307) 1(284,2018) 1(284,2082) 1(290.31,51.38) 1(290.31,98.62) 1(316,2018) 1(316,2082) 1(327,2253) 1(327,2447) 1(329.69,51.38) 1(329.69,98.62) 1(333.5,2184.25) 1(333.5,2184.25) 1(333.5,2215.75) 1(333.5,2215.75) 1(337.01,1348.5) 1(337.01,1411.5) 1(337.01,1473.5) 1(337.01,1536.5) 1(337.01,1598.5) 1(337.01,1661.5) 1(380.31,1851.38) 1(380.31,1898.62) 1(383,2253) 1(383,2253) 1(383,2253) 1(396.5,2184.25) 1(396.5,2184.25) 1(396.5,2215.75) 1(396.5,2215.75) 1(407,2253) 1(407,2253) 1(407,2253) 1(419.69,1851.38) 1(419.69,1898.62) 1(462.99,1348.5) 1(462.99,1411.5) 1(462.99,1473.5) 1(462.99,1536.5) 1(462.99,1598.5) 1(462.99,1661.5) 1(463,2253) 1(463,2447) 1(547.38,876.31) 1(547.38,915.69) 1(582,1456) 1(582,1456) 1(582,1463) 1(582,1657) 1(582,1664) 1(582,1664) 1(594.62,876.31) 1(594.62,915.69) 1(685,1836) 1(685,1854) 1(693.5,2404.5) 1(693.5,2404.5) 1(693.5,2435.5) 1(693.5,2435.5) 1(693.5,2634.5) 1(693.5,2634.5) 1(693.5,2665.5) 1(693.5,2665.5) 1(745.31,1725) 1(745.31,1745) 1(756.5,2404.5) 1(756.5,2404.5) 1(756.5,2435.5) 1(756.5,2435.5) 1(756.5,2634.5) 1(756.5,2634.5) 1(756.5,2665.5) 1(756.5,2665.5) 1(784.69,1725) 1(784.69,1745) 1(805,1836) 1(805,1854) 1(827.01,2973.5) 1(827.01,3036.5) 1(828,1456) 1(828,1456) 1(828,1463) 1(828,1657) 1(828,1664) 1(828,1664) 1(840,2765.31) 1(840,2804.69) 1(840,2855.31) 1(840,2894.69) 1(858.5,1734.25) 1(858.5,1734.25) 1(858.5,1765.75) 1(858.5,1765.75) 1(860,2765.31) 1(860,2804.69) 1(860,2855.31) 1(860,2894.69) 1(918.5,1502.01) 1(918.5,1627.99) 1(921.5,1734.25) 1(921.5,1734.25) 1(921.5,1765.75) 1(921.5,1765.75) 1(952.99,2973.5) 1(952.99,3036.5) 1(981.5,1502.01) 1(981.5,1627.99) 1(985,1390.31) 1(985,1429.69) 1(1005,1390.31) 1(1005,1429.69) 1(1040,1500) 1(1040,1500) 1(1040,1538) 1(1040,1612) 1(1040,1650) 1(1040,1650) 1(1058,1500) 1(1058,1650) 1(1080,2810.31) 1(1080,2849.69) 1(1088.5,1854.25) 1(1088.5,1854.25) 1(1088.5,1885.75) 1(1088.5,1885.75) 1(1100,2810.31) 1(1100,2849.69) 1(1104.25,1363.5) 1(1104.25,1363.5) 1(1104.25,1426.5) 1(1104.25,1426.5) 1(1135.75,1363.5) 1(1135.75,1363.5) 1(1135.75,1426.5) 1(1135.75,1426.5) 1(1141,2771) 1(1141,2771) 1(1141,2848) 1(1141,3002) 1(1141,3079) 1(1141,3079) 1(1145,2116) 1(1145,2134) 1(1151.5,1854.25) 1(1151.5,1854.25) 1(1151.5,1885.75) 1(1151.5,1885.75) 1(1152,1500) 1(1152,1650) 1(1170,1500) 1(1170,1500) 1(1170,1538) 1(1170,1610) 1(1170,1650) 1(1170,1650) 1(1205.31,2005) 1(1205.31,2025) 1(1231,1462) 1(1231,1462) 1(1231,1688) 1(1231,1688) 1(1233.5,1394.25) 1(1233.5,1394.25) 1(1233.5,1425.75) 1(1233.5,1425.75) 1(1243.5,1757.01) 1(1243.5,1882.99) 1(1244.69,2005) 1(1244.69,2025) 1(1265,2116) 1(1265,2134) 1(1296.5,1394.25) 1(1296.5,1394.25) 1(1296.5,1425.75) 1(1296.5,1425.75) 1(1306.5,1757.01) 1(1306.5,1882.99) 1(1313.5,2004.25) 1(1313.5,2004.25) 1(1313.5,2035.75) 1(1313.5,2035.75) 1(1368.5,1757.01) 1(1368.5,1882.99) 1(1376.5,2004.25) 1(1376.5,2004.25) 1(1376.5,2035.75) 1(1376.5,2035.75) 1(1405.31,2720) 1(1405.31,2740) 1(1431.5,1757.01) 1(1431.5,1882.99) 1(1444.69,2720) 1(1444.69,2740) 1(1449,1462) 1(1449,1462) 1(1449,1688) 1(1449,1688) 1(1449,2771) 1(1449,2771) 1(1449,2848) 1(1449,3002) 1(1449,3079) 1(1449,3079) 1(1598.5,1484.5) 1(1598.5,1484.5) 1(1598.5,1515.5) 1(1598.5,1515.5) 1(1618.5,2239.25) 1(1618.5,2239.25) 1(1618.5,2270.75) 1(1618.5,2270.75) 1(1645.31,2310) 1(1645.31,2330) 1(1661.5,1484.5) 1(1661.5,1484.5) 1(1661.5,1515.5) 1(1661.5,1515.5) 1(1681.5,2239.25) 1(1681.5,2239.25) 1(1681.5,2270.75) 1(1681.5,2270.75) 1(1684.69,2310) 1(1684.69,2330) 1(1741,2755) 1(1741,2835) 1(1773.5,2654.25) 1(1773.5,2654.25) 1(1773.5,2685.75) 1(1773.5,2685.75) 1(1792,2755) 1(1818,2755) 1(1836.5,2654.25) 1(1836.5,2654.25) 1(1836.5,2685.75) 1(1836.5,2685.75) 1(1869,2755) 1(1869,2835) 1(1896,2774.31) 1(1896,2813.69) 1(1904.53,2991.79) 1(1904.53,2991.79) 1(1904.53,3031.79) 1(1904.53,3112.79) 1(1904.53,3228.11) 1(1904.53,3228.11) 1(1916,2774.31) 1(1916,2813.69) 1(1940,1491) 1(1940,1509) 1(1965.5,1969.25) 1(1965.5,1969.25) 1(1965.5,2000.75) 1(1965.5,2000.75) 1(1972.64,2879.19) 1(1972.64,2879.19) 1(1972.64,2991.89) 1(1972.64,2991.89) 1(1972.64,2991.89) 1(1990.31,2650) 1(1990.31,2670) 1(1993.31,2035) 1(1993.31,2055) 1(1993.5,2709.25) 1(1993.5,2709.25) 1(1993.5,2740.75) 1(1993.5,2740.75) 1(2000.31,1375) 1(2000.31,1395) 1(2028.5,1969.25) 1(2028.5,1969.25) 1(2028.5,2000.75) 1(2028.5,2000.75) 1(2029.69,2650) 1(2029.69,2670) 1(2032.69,2035) 1(2032.69,2055) 1(2039.69,1375) 1(2039.69,1395) 1(2056.5,2709.25) 1(2056.5,2709.25) 1(2056.5,2740.75) 1(2056.5,2740.75) 1(2060,1491) 1(2060,1509) 1(2108.5,1379.25) 1(2108.5,1379.25) 1(2108.5,1410.75) 1(2108.5,1410.75) 1(2171.5,1379.25) 1(2171.5,1379.25) 1(2171.5,1410.75) 1(2171.5,1410.75) 1(2174,2693) 1(2174,2757) 1(2177.36,2879.19) 1(2177.36,2879.19) 1(2177.36,2991.89) 1(2177.36,2991.89) 1(2177.36,2991.89) 1(2206,2693) 1(2206,2757) 1(2245.47,3112.79) 1(2245.47,3228.11) 1(2245.47,3228.11) 1(2245.79,2991.79) 1(2245.79,2991.79) 1(2245.79,3031.79) 1(2250,1763) 1(2250,1763) 1(2250,1780) 1(2250,1870) 1(2250,1887) 1(2250,1887) 1(2275.31,1575) 1(2275.31,1595) 1(2314.69,1575) 1(2314.69,1595) 1(2315.31,2290) 1(2315.31,2310) 1(2318,1374) 1(2318,1446) 1(2318.5,2219.25) 1(2318.5,2219.25) 1(2318.5,2250.75) 1(2318.5,2250.75) 1(2354.69,2290) 1(2354.69,2310) 1(2366,1446) 1(2368.5,2834.5) 1(2368.5,2834.5) 1(2368.5,2865.5) 1(2368.5,2865.5) 1(2380.31,1275) 1(2380.31,1295) 1(2381.5,2219.25) 1(2381.5,2219.25) 1(2381.5,2250.75) 1(2381.5,2250.75) 1(2394,1446) 1(2398.5,1639.25) 1(2398.5,1639.25) 1(2398.5,1670.75) 1(2398.5,1670.75) 1(2419.69,1275) 1(2419.69,1295) 1(2425.31,1520) 1(2425.31,1540) 1(2431.5,2834.5) 1(2431.5,2834.5) 1(2431.5,2865.5) 1(2431.5,2865.5) 1(2442,1374) 1(2442,1446) 1(2461.5,1639.25) 1(2461.5,1639.25) 1(2461.5,1670.75) 1(2461.5,1670.75) 1(2464.69,1520) 1(2464.69,1540) 1(2470,1390.31) 1(2470,1429.69) 1(2480,1763) 1(2480,1763) 1(2480,1780) 1(2480,1870) 1(2480,1887) 1(2480,1887) 1(2490,1390.31) 1(2490,1429.69) 1(2503,2732) 1(2503,2868) 1(2509,3091) 1(2509,3091) 1(2509,3120) 1(2509,3200) 1(2509,3229) 1(2509,3229) 1(2599,1400) 1(2599,1400) 1(2599,1413) 1(2599,1687) 1(2599,1700) 1(2599,1700) 1(2600.31,1780) 1(2600.31,1800) 1(2635.31,1350) 1(2635.31,1370) 1(2639.69,1780) 1(2639.69,1800) 1(2674.69,1350) 1(2674.69,1370) 1(2675.64,2978.4) 1(2675.64,2978.4) 1(2675.64,3091) 1(2677,1853) 1(2677,2047) 1(2697,2732) 1(2697,2788) 1(2697,2788) 1(2697,2788) 1(2697,2812) 1(2697,2812) 1(2697,2812) 1(2697,2868) 1(2733,2047) 1(2733,2047) 1(2733,2047) 1(2743,3091) 1(2744,2796) 1(2744,2796) 1(2744,2874) 1(2744,2874) 1(2751,2459) 1(2751,2459) 1(2751,2511) 1(2751,2511) 1(2753,2796) 1(2753,2874) 1(2757,2047) 1(2757,2047) 1(2757,2047) 1(2770.31,1730) 1(2770.31,1750) 1(2797,2796) 1(2797,2874) 1(2806,2796) 1(2806,2796) 1(2806,2874) 1(2806,2874) 1(2809.69,1730) 1(2809.69,1750) 1(2812,3091) 1(2813,1853) 1(2813,2047) 1(2819,2459) 1(2819,2459) 1(2819,2511) 1(2819,2511) 1(2821,1400) 1(2821,1400) 1(2821,1413) 1(2821,1687) 1(2821,1700) 1(2821,1700) 1(2847,2465.31) 1(2847,2504.69) 1(2867,2465.31) 1(2867,2504.69) 1(2880.36,2978.4) 1(2880.36,2978.4) 1(2880.36,3091) 1(2926,2719) 1(2926,2719) 1(2926,2728) 1(2926,2772) 1(2926,2781) 1(2926,2781) 1(2929,2124) 1(2929,2124) 1(2929,2626) 1(2929,2626) 1(2940.31,1525) 1(2940.31,1545) 1(2979.69,1525) 1(2979.69,1545) 1(3004,2719) 1(3004,2719) 1(3004,2728) 1(3004,2772) 1(3004,2781) 1(3004,2781) 1(3047,1853) 1(3047,2047) 1(3047,3091) 1(3047,3091) 1(3047,3120) 1(3047,3200) 1(3047,3229) 1(3047,3229) 1(3058,2124) 1(3058,2626) 1(3103,2047) 1(3103,2047) 1(3103,2047) 1(3120.35,1474.33) 1(3120.35,1474.33) 1(3120.35,1765.67) 1(3120.35,1765.67) 1(3127,2047) 1(3127,2047) 1(3127,2047) 1(3153.82,1474.33) 1(3153.82,1765.67) 1(3183,1853) 1(3183,2047) 1(3256.18,1474.33) 1(3256.18,1765.67) 1(3260.87,1813.41) 1(3275.87,1798.41) 1(3275.87,1828.41) 1(3289.65,1474.33) 1(3289.65,1474.33) 1(3289.65,1765.67) 1(3289.65,1765.67) 1(3290.87,1813.41) 1(3302,2124) 1(3302,2626) 1(3329,3091) 1(3329,3091) 1(3329,3120) 1(3329,3200) 1(3329,3229) 1(3329,3229) 1(3343,1535) 1(3343,1535) 1(3343,1765) 1(3343,1765) 1(3344.88,1979.57) 1(3344.88,1979.57) 1(3344.88,1991.38) 1(3344.88,2038.62) 1(3344.88,2050.43) 1(3344.88,2050.43) 1(3360,1535) 1(3360,1765) 1(3403,2732) 1(3403,2788) 1(3403,2788) 1(3403,2788) 1(3403,2812) 1(3403,2812) 1(3403,2812) 1(3403,2868) 1(3412.91,1854.41) 1(3412.91,1854.41) 1(3412.91,1905.59) 1(3412.91,1905.59) 1(3431,2124) 1(3431,2124) 1(3431,2626) 1(3431,2626) 1(3450,1535) 1(3450,1765) 1(3455.12,1979.57) 1(3455.12,1979.57) 1(3455.12,1991.38) 1(3455.12,2038.62) 1(3455.12,2050.43) 1(3455.12,2050.43) 1(3465,3091) 1(3467,1535) 1(3467,1535) 1(3467,1765) 1(3467,1765) 1(3527.09,1854.41) 1(3527.09,1854.41) 1(3527.09,1905.59) 1(3527.09,1905.59) 1(3534,3091) 1(3586.59,1655.87) 1(3597,2732) 1(3597,2868) 1(3600.31,1351.38) 1(3600.31,1398.62) 1(3601.59,1640.87) 1(3601.59,1670.87) 1(3616.59,1655.87) 1(3639.69,1351.38) 1(3639.69,1398.62) 1(3644,2748) 1(3644,2748) 1(3644,2916) 1(3644,2916) 1(3649.33,1500.35) 1(3649.33,1500.35) 1(3649.33,1533.82) 1(3649.33,1636.18) 1(3649.33,1669.65) 1(3649.33,1669.65) 1(3664,2936) 1(3664,2936) 1(3670,3091) 1(3670,3091) 1(3670,3120) 1(3670,3200) 1(3670,3229) 1(3670,3229) 1(3678.5,2988.25) 1(3678.5,2988.25) 1(3678.5,3019.75) 1(3678.5,3019.75) 1(3700,2531) 1(3700,2549) 1(3704,2748) 1(3706,2936) 1(3741.5,2988.25) 1(3741.5,2988.25) 1(3741.5,3019.75) 1(3741.5,3019.75) 1(3760.31,2415) 1(3760.31,2435) 1(3769,2936) 1(3772,2748) 1(3799.69,2415) 1(3799.69,2435) 1(3807,2936) 1(3807,2936) 1(3820,2531) 1(3820,2549) 1(3832,2748) 1(3832,2748) 1(3832,2911) 1(3832,2911) 1(3873.5,2419.25) 1(3873.5,2419.25) 1(3873.5,2450.75) 1(3873.5,2450.75) 1(3893.38,2878.31) 1(3893.38,2917.69) 1(3936.5,2419.25) 1(3936.5,2419.25) 1(3936.5,2450.75) 1(3936.5,2450.75) 1(3940.62,2878.31) 1(3940.62,2917.69) 1(3940.67,1500.35) 1(3940.67,1500.35) 1(3940.67,1533.82) 1(3940.67,1636.18) 1(3940.67,1669.65) 1(3940.67,1669.65)
  round 5 on Mech4: 1(1550,1752) 1(1550,1752) 1(1550,1848) 1(1550,1848) 1(2150,1752) 1(2150,1752) 1(2150,1848) 1(2150,1848) 1(2565,2133) 1(2565,2377) 1(2845,2133) 1(2845,2377) 1(3540,2128) 1(3540,2372) 1(3820,2128) 1(3820,2372)
  round 2.96 on Mech4: 1(3628.07,1759.02) 1(3628.07,2010.98) 1(3761.93,1759.02) 1(3761.93,2010.98) 1(3823.07,1759.02) 1(3823.07,2010.98) 1(3956.93,1759.02) 1(3956.93,2010.98)

## Via types
v1: diameter 23.62, hole 11.81, Top Layer to Bottom Layer, tented both sides, 232 vias
v2: diameter 23.62, hole 11.81, Top Layer to Bottom Layer, 3 vias

## Nets (pads, with @x,y where several pads share a name; then routed paths per layer and width w, separated by ;. In a path a pad name is that pad's centre, name@x,y a point inside that pad or via, vN(x,y) a via of type N, cw(c..) or ccw(c..) an arc to the next point about the centre after c; other vN are vias at no path point)
1\2\V\_\E\N\: J38.1 R45.1 U6.18 | length 1252.3
  Top Layer w10: U6.18@1872.05,2126.77 v1@1872.05,2178
  Top Layer w25: J38.1@1471.02,1387.7 R45.1@1544,1389
  Bottom Layer w10: J38.1@1471,1389 1526,1444 1526,2126 1578.47,2178.47 v1(1872.52,2178.47)
5\V\_\E\N\: J21.1 R58.1 U6.2 | length 1426.9
  Top Layer w10: U6.2@1776.77,2477.95 v1@1828,2477.95
  Top Layer w12: R58.1@624,2524 J21.1@835,2524
  Layer 1 w10: J21.1@835,2524 835,2428 901,2362 1712.99,2362 v1(1828.47,2477.48)
5V: C44.2 C45.2 C49.2 J53.1 J54.1 L3.2 Q5.1 Q5.2 Q5.3 R26.2 R38.2 R53.2 R54.2 R59.2 R100.1 | length 1438.7
  Top Layer w10: v1(1495,1585) R100.1@1525,1585
  Top Layer w22: R54.2@225,2068.5 225,2104 239,2118 v1(437,2118)
  Top Layer w25: v1(1030,2067) R26.2@1030,2095 ; L3.2@1405.24,2925 1465,2925 ; 1512,2667 1514,2669
  Bottom Layer w10: v1(1482,2465) 1482,2425 1351.57,2294.57 1339,2282 1339,1637 1391,1585 v1(1495,1585)
  other v1: 445,2274 445,2310.67 445,2347.33 445,2384 1182,2465 1225,2465 1525,2465 1182,2501.67 1225,2501.67 1482,2501.67 1525,2501.67 1182,2538.33 1225,2538.33 1482,2538.33 1525,2538.33 1182,2575 1225,2575 1482,2575 1525,2575 1373,2815 1409.67,2815 1446.33,2815 1483,2815 1519.67,2815 1373,2858 1409.67,2858 1446.33,2858 1483,2858 1519.67,2858
5V_MON: C25.1 J33.1 J34.1 R28.2 U6.16 | length 274
  Top Layer w10: 1557,2097 1557,2115 1644.36,2202.36 U6.16@1776.77,2202.36
5V_OK: J56.1 R59.1 U6.1 U14.2 | length 1388.6
  Top Layer w8: J56.1@587,2902 638.52,2902 709,2831.52 v1(817,2723.52) 921.52,2723.52 940.47,2742.47 U14.2@940.47,2774.88
  Layer 1 w8: v1(817,2723.52) 838.52,2702 v1(1729,2702)
5VPIC: C15.1 C16.1 C17.1 C18.1 C19.1 C20.1 C21.1 C22.1 C23.1 C24.1 C27.1 C28.1 C42.2 J20.2 J27.1 J52.1 R22.2 R23.2 R24.2 R25.2 R52.2 R56.1 U6.10 U6.19 U6.26 U6.38 U6.57 U7.5 U7.6 U8.5 U8.6 U9.5 U9.6 U10.5 U10.6 U13.5 | length 4525.1
  Top Layer w10: J20.2@1701,1801 1755,1855 1892.25,1855 J27.1@1946.25,1909 1917,1909 1907.5,1918.5 R22.2@1907.5,1958 1907.5,1995.5 1891.73,2011.27 U6.19@1891.73,2126.77 ; v1@3758,2364 v1(3758,2365)
  Top Layer w12: R56.1@778,2648 804,2648 826,2670 v1(826,2670.31) ; U6.10@1776.77,2320.47 1821.53,2320.47 v1(1822,2320) ; v2(1989,2527) U6.57@1989,2573.07 ; U6.26@2029.53,2126.77 v1@2029.53,2171.53 ; J52.1@2127,2834 2134.5,2826.5 R52.2@2210,2826.5 ; v1(2161,2319) 2179.21,2300.79 U6.38@2223.23,2300.79
  Top Layer w20: v1(1970,1384) 2000.5,1384 C28.1@2001.5,1385
  Layer 1 w12: v1(742,1764) 742,1947 813,2018 1181,2018 v1(1205,2042)
  Layer 1 w20: v1(1741,1544) 1741,1446 1803,1384 v1(1970,1384)
  Bottom Layer w10: v1(2161,2319) 2207,2365 v1(3758,2365)
  Bottom Layer w12: v1(742,1764) 742,2586.31 v1(826,2670.31)
  other v1: 2314,2102 2030,2172
12V_MON: C29.1 J41.1 J42.1 R35.2 U6.17 | length 1101.8
  Top Layer w10: J42.1@1571,2010 1803,2010 1852.36,2059.36 U6.17@1852.36,2126.77
  Layer 1 w10: J41.1@860,1958 862,1960 1521,1960 J42.1@1571,2010
BATT+: C14.1 D5.1 J14.1 J17.4 R7.2 R8.2 R11.1 U2.8 | length 187.7
  Top Layer w12: U2.8@2572.56,1486.02 v1(2629,1486)
  Top Layer w45: J14.1@440,940 440.69,939.31 R11.1@571,939.31
  other v1: 3583.46,1496 3620.73,1496 3583.46,1539 3620.73,1539 3583.73,1582 3621,1582
BATT-: J13.1 R10.2 | length 344.6
  Top Layer w45: R10.2@75,846.69 75,720 130.13,664.87 J13.1@270.04,664.87
BATT_THERM+: J12.1 J13.3 R4.2 R5.2 | length 3714.7
  Top Layer w12: v1(3002,1403) 3005.5,1406.5 3005.5,1432.5
  Top Layer w30: J12.1@246,299 246,391 270.04,415.04 J13.3@270.04,499.52
  Bottom Layer w20: J13.3@272.46,497.1 361.35,586 576,586 675,685 675,1232 725,1282 2963,1282 3002,1321 v1(3002,1403)
BUFFOUT1: R29.1 U8.1 U8.4 | length 166.9
  Top Layer w12: U8.4@3722.6,2398.43 3722.6,2436.6 3733,2447 3788.97,2447 3796,2454.03 3796,2500.17 U8.1@3797.4,2501.57
BUFFOUT2: R34.1 U9.1 U9.4 | length 245.5
  Top Layer w10: U9.4@1962.6,1448.43 1962.6,1484.6 1974,1496 2025,1496 2037.4,1508.4 U9.1@2037.4,1551.57
  Top Layer w12: U9.1@2037.4,1551.57 2061.43,1551.57 2083,1530 R34.1@2110,1530
BUFFOUT3: R28.1 U7.1 U7.4 | length 166.6
  Top Layer w12: U7.4@1162.6,2068.43 1162.6,2101.6 1174,2113 1231,2113 1239,2121 ; 1239,2122.6 U7.1@1239,2171.57
BUFFOUT4: R35.1 U10.1 U10.4
C\H\R\G\R\_\I\N\T\: J32.1 R25.1 U2.11 U6.33 | length 1338.2
  Top Layer w8: U6.33@2223.23,2202.36 2275.64,2202.36 v1(2292,2186)
  Top Layer w12: R25.1@2353.5,1993 J32.1@2403,1993 ; v1(2711,1505) 2781.16,1434.84 U2.11@2847.44,1434.84
  Bottom Layer w12: v1(2292,2186) 2271,2165 2271,2031 2309,1993 J32.1@2403,1993 2609,1993 2711,1891 v1(2711,1505)
CHRGR_SCL: J31.1 R24.1 U2.13 U6.34 | length 1258
  Top Layer w8: U6.34@2223.23,2222.05 2340.95,2222.05 2354,2209 J31.1@2354,2146 2354,2075.5 R24.1@2354.5,2075
  Top Layer w12: v1(2748,1504) 2765.98,1486.02 U2.13@2847.44,1486.02
  Bottom Layer w12: J31.1@2354,2146 2483,2146 2735,1894 2735,1517 v1(2748,1504)
CHRGR_SDA: J30.1 R23.1 U2.14 U6.35 | length 1569.2
  Top Layer w8: U6.35@2223.23,2241.73 2353.27,2241.73 2449,2146 J30.1@2570,2146 2570,2060 2544,2034 R23.1@2353.5,2034
  Top Layer w12: v1(2761.93,1535.93) 2786.26,1511.61 U2.14@2847.44,1511.61
  Bottom Layer w12: J30.1@2570,2146 2714,2146 2761.93,2098.07 v1(2761.93,1535.93)
DCIN_MON: C26.1 J35.1 J36.1 R29.2 U6.27 | length 3019.3
  Top Layer w10: U6.27@2049.21,2126.77 2049.21,2088.79 2059,2079 v1(2094,2079)
  Top Layer w12: 3924,2451 3925,2452 J35.1@3925,2716
  Bottom Layer w10: J36.1@1571,1890 1755,1890 1944,2079 v1(2094,2079) 2094,2205 2131,2242 3865,2242 3912,2289 v1(3912,2376)
DCIN_S: C3.1 C9.1 D4.2 D6.2 J2.1 Q1.1 Q1.2 Q1.3 R1.2 R2.2 R27.2 U3.5 U4.5 U4.6 U4.7 U4.8 | length 1565.7
  Top Layer w10: U3.5@2785,2510.12 2785,2493 2794,2484 2837.5,2484 C3.1@2857,2503.5 2966.5,2503.5 2999,2536 2999,2759 3022,2782 D6.2@3032.55,2782 ; D6.2@3030,2782 J2.1@3092,2844
  Top Layer w12: v1(2678,1633) 2700.5,1655.5 R2.2@2700.5,1740 ; U4.5@3223.27,1875 v1(3265,1875) ; U4.6@3223.27,1925 v1(3265,1925) ; U4.7@3223.27,1975 v1(3265,1975) ; U4.8@3223.27,2025 v1(3265,2025) ; D4.2@3327.5,2027 v1(3327.5,2068.73) ; 3501,2624 3502,2625 R1.2@3536.5,2625
  Layer 1 w20: v1(2678,1633) 2756,1711 3129,1711 3171,1753 v1(3171,1805)
  other v1: 3205,1805 3239,1805 3420,2750 3456.67,2750 3493.33,2750 3530,2750
GND: C1.2 C2.1 C3.2 C4.2 C5.2 C6.2 C7.2 C8.1 C9.2 C11.1 C12.2 C13.1 C14.2 C15.2 C16.2 C17.2 C18.2 C19.2 C20.2 C21.2 C22.2 C23.2 C24.2 C25.2 C26.2 C27.2 C28.2 C29.2 C30.2 C31.1 C32.1 C34.1 C35.1 C36.1 C38.1 C39.1 C40.1 C41.1 C42.1 C43.1 C44.1 C45.1 C46.1 C47.1 C50.1 D2.2 J3.2 J10.2 J11.1 J13.4 J15.1 J17.2 J17.3 J20.3 J28.1 J43.2 J46.1 LED1.2 LED2.2 LED3.2 Q1.4 Q4.2 Q6.2 Q7.2 Q8.2 R1.1 R10.1 R12.2 R14.1 R16.2 R17.1 R18.1 R19.1 R20.1 R21.1 R30.1 R31.1 R36.1 R37.1 R40.1 R41.2 R46.2 R47.1 R48.1 R49.1 R55.2 R60.2 U1.2 U2.10 U2.16 U3.3 U5.1 U5.2 U5.3 U6.9 U6.20 U6.25 U6.41 U6.56 U7.2 U8.2 U9.2 U10.2 U11.2 U11.6 U13.2 U14.5 U14.6 U14.13 | length 1913